# Altium PCB servo_shield.pcbdoc (part 2 of 2)
Units mil, origin at the board's own origin, x right, y up, seen from the top; angles counter-clockwise.
Board outline 4750.63 x 4655.55 mil, 4 copper layers (Top Layer, GND, PWR, Bottom Layer), stack 62.447 mil thick; 94 components, 126 nets, 466 pads, 102 vias.
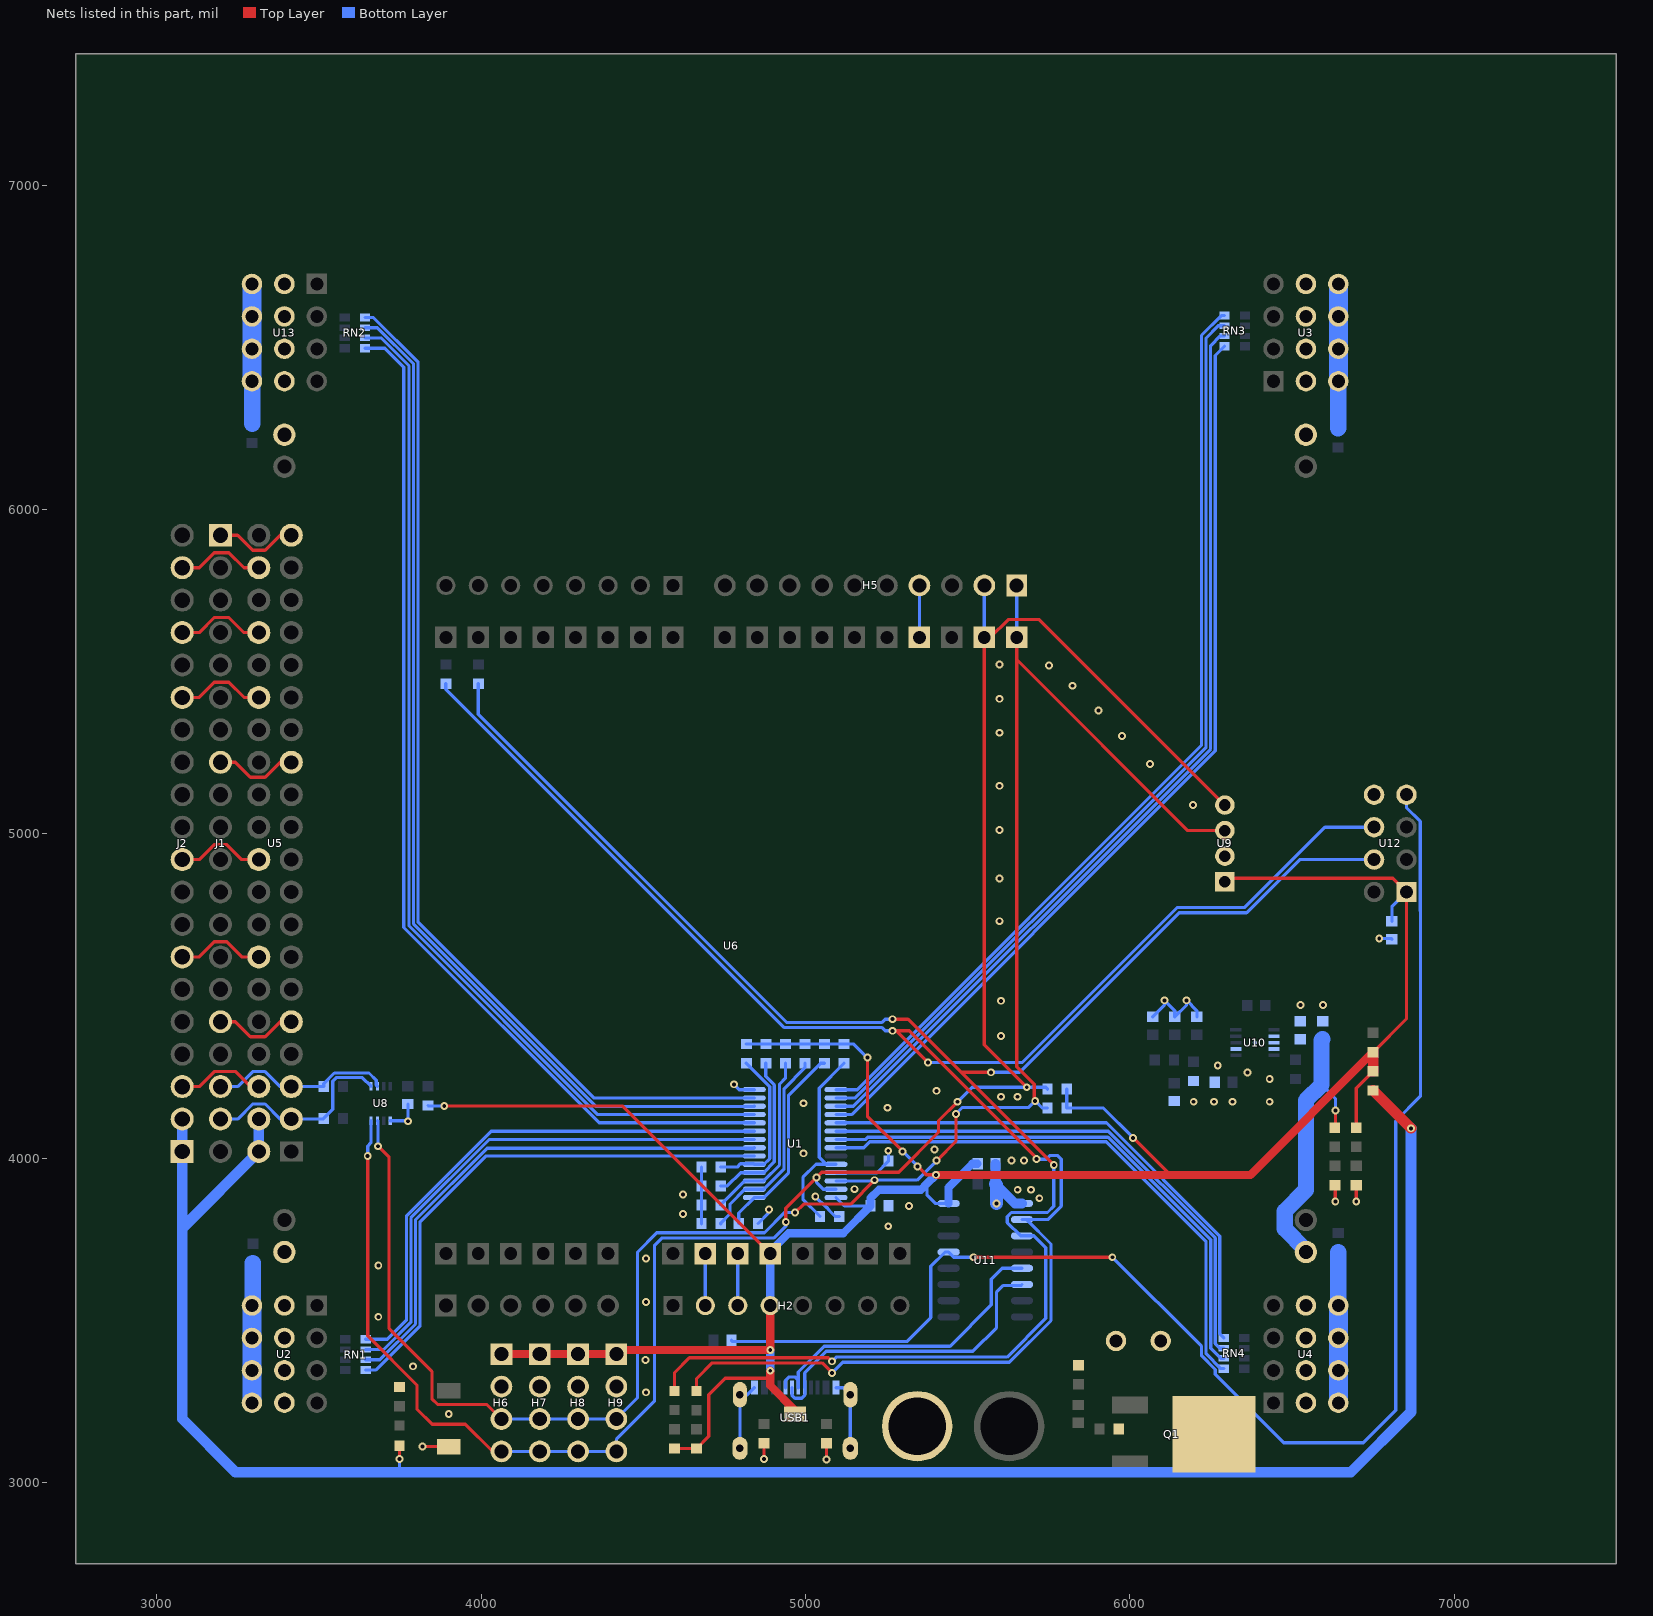
[diagram p4: the nets of this part, all layers, seen from the top]

## Via types
v1: diameter 24.02, hole 12.01, Top Layer to Bottom Layer, 102 vias

## Nets (pads, with @x,y where several pads share a name; then routed paths per layer and width w, separated by ;. In a path a pad name is that pad's centre, name@x,y a point inside that pad or via, vN(x,y) a via of type N, cw(c..) or ccw(c..) an arc to the next point about the centre after c; other vN are vias at no path point) (continued)
+5V: C1.1 C18.1 C22.2 F1.1 H2.4 H6.1 H7.1 H8.1 H9.1 LED3.2 R3.2 R4.2 R24.2 R25.2 R28.2 R29.2 R30.1 SJ_A0.1 SJ_A1.1 SJ_A2.1 SJ_A3.1 SJ_A4.1 SJ_A5.1 U1.28 U6.5V U9.1 U11.16 U12.1 | length 8402.1
  Top Layer w10: v1(3886.5,4160.51) 4436.7,4160.51 U6.5V@4891.65,3705.57 ; R24.2@4596.5,3104.85 R25.2@4664.5,3104.85 4702.5,3142.85 4702.5,3270.51 4753.06,3321.07 4880.72,3321.07 4891.65,3332 ; v1(5191.38,4309.92) 5191.38,4129.21 v1(5299.8,4020.79) ; v1(5345.98,3974.61) 5372.08,3948.51 v1(5402.5,3948.51) ; v1(6010.5,4062.51) 6124.5,3948.51 ; U9.1@6293.5,4852.4 6304.09,4862.99 6811.02,4862.99 U12.1@6853.5,4820.51 6853.5,4429.85 R29.2@6750.5,4326.85 ; LED3.2@6698.5,4094 6698.5,4216.17 R30.1@6750.5,4268.17
  Top Layer w25: H6.1@4062.99,3395.71 H7.1@4181.1,3395.71 H8.1@4299.21,3395.71 H9.1@4417.32,3395.71 4430.13,3408.51 v1(4891.65,3408.51) H2.4@4891.65,3545.51 ; v1(4891.65,3344.51) 4891.65,3332 4891.65,3298.48 4968.5,3221.63 F1.1@4968.5,3211.4 ; v1(5402.5,3948.51) 6124.5,3948.51 6372.16,3948.51 R29.2@6750.5,4326.85
  Top Layer w33: R30.1@6750.5,4268.17 R29.2@6750.5,4326.85
  Bottom Layer w10: R28.2@3836.5,4162.35 3838.34,4160.51 v1(3886.5,4160.51) ; SJ_A4.1@4817.91,4351.63 SJ_A3.1@4878.15,4351.63 SJ_A2.1@4938.39,4351.63 SJ_A1.1@4998.62,4351.63 SJ_A0.1@5058.86,4351.63 SJ_A5.1@5119.09,4351.63 5149.67,4351.63 v1(5191.38,4309.92) ; U1.28@5094.48,3878.55 5120.52,3852.51 C1.1@5200.94,3852.51 ; v1(5299.8,4020.79) v1(5345.98,3974.61) ; 5375.43,3921.44 5375.43,3885.44 5400.4,3860.47 U11.16@5441.71,3860.47 ; R4.2@5806.16,4212.51 R3.2@5806.16,4154.51 5918.5,4154.51 v1(6010.5,4062.51) ; C22.2@6808.5,4730.07 6808.5,4775.51 U12.1@6853.5,4820.51
  Bottom Layer w25: v1(4891.65,3344.51) v1(4891.65,3408.51) ; H2.4@4891.65,3545.51 4891.65,3705.56 4891.65,3711.65 4948.5,3768.51 5116.94,3768.51 C1.1@5200.94,3852.51 5200.94,3876.95 5226.5,3902.51 5356.5,3902.51 5375.43,3921.44 v1(5402.5,3948.51) ; U11.16@5441.71,3860.47 5441.71,3909.72 5514.63,3982.64 C18.1@5531.26,3982.64
A0: R18.2 SJ_A0.2 U1.1 | length 626.9
  Bottom Layer w10: R18.2@4794.84,3798.51 4794.84,3830.86 U1.1@4842.52,3878.54 4871.28,3878.54 4948.35,3955.6 4948.35,4193.62 5047.04,4292.31 SJ_A0.2@5058.86,4292.31
A1: R17.2 SJ_A1.2 U1.2 | length 635.6
  Bottom Layer w10: R17.2@4739.15,3797.91 4739.15,3799.46 4767.72,3828.03 4767.72,3858.08 4813.77,3904.13 U1.2@4842.52,3904.13 4871.27,3904.13 4934.33,3967.19 4934.33,4213.88 4998.62,4278.17 SJ_A1.2@4998.62,4292.31
A2: R16.2 SJ_A2.2 U1.3 | length 553
  Bottom Layer w10: R16.2@4739.15,3856.14 4812.73,3929.73 U1.3@4842.52,3929.73 4871.28,3929.73 4920.31,3978.76 4920.31,4227.6 4938.39,4245.67 SJ_A2.2@4938.39,4292.31
A3: R15.2 SJ_A3.2 U1.4 | length 510.5
  Bottom Layer w10: R15.2@4739.15,3914.37 4759.69,3914.37 4800.63,3955.32 U1.4@4842.52,3955.32 4871.28,3955.32 4904.21,3988.25 4904.21,4225.83 4878.15,4251.89 SJ_A3.2@4878.15,4292.31
A4: R14.2 SJ_A4.2 U1.5 | length 486.8
  Bottom Layer w10: R14.2@4739.15,3972.6 4789.8,3972.6 4799.84,3982.64 4840.79,3982.64 U1.5@4842.52,3980.91 4872.4,3980.91 4890.2,3998.7 4890.2,4220.03 SJ_A4.2@4817.91,4292.31
A5: R13.2 SJ_A5.2 U1.24 | length 613.1
  Bottom Layer w10: R13.2@5045.26,3820 4992.5,3872.76 4992.5,3940.51 5032.9,3980.91 U1.24@5064.6,3980.91 ; U1.24@5094.48,3980.91 U1.24@5064.6,3980.91 ; SJ_A5.2@5119.09,4292.31 5042.8,4216.01 5042.8,4002.72 U1.24@5064.6,3980.91
D+: U11.5 USB1.6 USB1.8 | length 987.3
  Bottom Layer w10: USB1.8@4938.98,3292.36 4938.98,3315.78 4948.2,3325 4969.11,3325 4978.35,3315.77 ; USB1.6@4978.35,3292.36 4978.35,3315.77 ; U11.5@5667.89,3660.47 5606.92,3660.47 5573.47,3627.03 5573.47,3547.48 5446.36,3420.37 5058.07,3420.37 4978.35,3340.64 4978.35,3315.77
D-: U11.6 USB1.5 USB1.7 | length 987
  Bottom Layer w10: USB1.7@4958.66,3292.36 4958.66,3268.96 4967.89,3259.73 4988.8,3259.73 4998.62,3269.54 4998.62,3291.77 USB1.5@4998.03,3292.36 4998.03,3337.7 5064.7,3404.37 5516.36,3404.37 5589.47,3477.48 5589.47,3587.62 5609.02,3607.17 5664.59,3607.17 U11.6@5667.89,3610.47
DTR: C19.1 U11.13 U12.7 | length 4514.9
  Top Layer w10: v1(5518.5,3694.51) v1(5946.5,3694.51)
  Bottom Layer w10: C19.1@4772.06,3438.51 4776.19,3434.39 5312.38,3434.39 5386.5,3508.51 5386.5,3666.51 5430.46,3710.47 U11.13@5441.71,3710.47 5457.67,3694.51 v1(5518.5,3694.51) ; v1(5946.5,3694.51) 6221.54,3419.48 6221.54,3390.43 6263.58,3348.38 6263.58,3333.76 6474.83,3122.51 6720.5,3122.51 6820.5,3222.51 6820.5,4114.51 6896.5,4190.51 6896.5,4762.51 6895.98,4763.03 6895.98,5038.11 6853.5,5080.59 U12.7@6853.5,5120.51
GND: C1.2 C5.2 C6.2 C10.2 C11.2 C12.1 C13.1 C14.1 C15.1 C16.1 C17.1 C18.2 C22.1 H2.2 H2.3 H5.4 H6.2 H7.2 H8.2 H9.2 J1.1 J1.8 J1.16 J2.3 J2.7 J2.10 J2.15 J2.17 J2.19 R1.2 R5.2 R7.2 R8.2 R9.1 R11.1 R12.1 R13.1 R14.1 R15.1 R16.1 R17.1 R18.1 R20.2 R22.1 R23.1 R33.1 R34.1 SW1.1 U1.14 U1.25 U2.9 U2.10 U2.11 U2.12 U3.9 U3.10 U3.11 U3.12 U4.9 U4.10 U4.11 U4.12 U5.6 U5.9 U5.14 U5.20 U5.25 U5.30 U5.34 U5.38 U5.39 U6.GND U6.GND1 U6.GND2 U8.1 U9.2 U10.4 U10.7 U10.11 U11.1 U12.8 U13.9 U13.10 U13.11 U13.12 U14.2 USB1.1 USB1.12 USB1.13 USB1.14 | length 6634.6
  Top Layer w10: J2.3@3078.74,4220.51 3131.21,4220.51 3177.62,4266.93 3244.09,4266.93 3290.5,4220.51 U5.6@3314.96,4220.51 ; J2.7@3078.74,4620.51 3131.21,4620.51 3177.62,4666.93 3216.08,4666.93 3262.49,4620.51 U5.14@3314.96,4620.51 ; J2.10@3078.74,4920.51 3131.21,4920.51 3177.62,4966.93 3216.08,4966.93 3262.49,4920.51 U5.20@3314.96,4920.51 ; J2.15@3078.74,5420.51 3131.21,5420.51 3177.62,5466.93 3222.72,5466.93 3269.14,5420.51 U5.30@3314.96,5420.51 ; J2.17@3078.74,5620.51 3131.21,5620.51 3177.62,5666.93 3222.72,5666.93 3269.14,5620.51 U5.34@3314.96,5620.51 ; J2.19@3078.74,5820.51 3131.21,5820.51 3177.62,5866.93 3222.72,5866.93 3269.14,5820.51 U5.38@3314.96,5820.51 ; J1.16@3196.85,4420.51 3242.67,4420.51 3289.09,4374.09 3334.19,4374.09 3380.6,4420.51 U5.9@3414.96,4420.51 ; J1.8@3196.85,5220.51 3242.67,5220.51 3289.09,5174.09 3334.19,5174.09 3380.6,5220.51 U5.25@3414.96,5220.51 ; J1.1@3196.85,5920.51 3249.32,5920.51 3295.73,5874.09 3334.19,5874.09 3380.6,5920.51 U5.39@3414.96,5920.51 ; v1(3820,3111.22) 3899.78,3111.22 SW1.1@3900.5,3110.49 ; v1(4872.5,3072.41) R22.1@4872.5,3120.85 ; R23.1@5064.5,3120.85 5065.51,3119.85 v1(5065.51,3071.22) ; R7.2@6632.5,3916.85 6634.06,3915.3 v1(6634.06,3865.97) ; v1(6698.5,3865.97) R8.2@6698.5,3916.85
  Bottom Layer w10: U8.1@3720.03,4115.37 3772.91,4115.37 v1(3774.51,4113.76) C6.2@3774.51,4166.54 ; R17.1@4679.83,3797.91 R16.1@4679.83,3856.14 R15.1@4679.83,3914.37 R14.1@4679.83,3972.6 ; H2.2@4691.65,3545.51 U6.GND1@4691.65,3705.56 ; v1(4779.76,4227.6) 4796.14,4211.23 U1.14@4842.52,4211.23 ; H2.3@4791.65,3545.52 U6.GND2@4791.65,3705.57 ; USB1.14@4798.23,3105.35 USB1.14@4798.22,3270.72 4820.87,3270.71 USB1.12@4842.52,3292.36 ; R18.1@4854.16,3798.51 4888.19,3832.54 v1(4888.19,3842.09) ; v1(5030.75,3881.5) 5064.26,3847.99 5065.69,3847.99 5072.12,3841.56 5072.12,3840.13 5092.25,3820 R13.1@5104.58,3820 ; USB1.1@5094.49,3292.36 5117.13,3292.36 USB1.13@5138.78,3270.72 USB1.13@5138.78,3105.35 ; U1.25@5094.48,3955.32 5220.97,3955.32 R1.2@5256.16,3990.51 5256.16,4022.26 v1(5255.63,4022.8) ; U6.GND@5351.65,5605.57 H5.4@5351.65,5765.63 ; C16.1@6070.83,4435.87 6106.97,4472.01 v1(6106.97,4486.61) 6139.09,4454.49 C15.1@6139.09,4435.87 6175.49,4472.26 v1(6175.49,4486.61) 6207.36,4454.74 C14.1@6207.36,4435.87 ; v1(6769.57,4677.36) 6806.09,4677.36 C22.1@6808.5,4674.95
  Bottom Layer w30: C17.1@5586.38,3920.39 C18.2@5586.38,3982.64 ; C17.1@5589.01,3917.76 5646.3,3860.47 U11.1@5667.89,3860.47
  Bottom Layer w39.37: C17.1@5586.38,3920.39 5589.01,3917.76 v1(5589.01,3860.47)
  Bottom Layer w50: U2.9@3293.7,3545.71 3296.5,3548.51 R33.1@3296.5,3676.85 ; U13.12@3293.7,6395.31 3294.5,6394.51 R34.1@3294.5,6264.17 ; R9.1@6642.5,6250.17 6643.31,6250.98 U3.9@6643.31,6395.32 ; R12.1@6643.07,3710.03 6643.07,3545.92 U4.12@6643.29,3545.7
  Bottom Layer w59.06: U4.9@6643.29,3245.7 U4.10@6643.29,3345.7 U4.11@6643.29,3445.7 U4.12@6643.29,3545.7
  Bottom Layer w59.1: U2.12@3293.7,3245.71 U2.11@3293.7,3345.71 U2.10@3293.7,3445.71 U2.9@3293.7,3545.71 ; U13.12@3293.7,6395.31 U13.11@3293.7,6495.31 U13.10@3293.7,6595.31 U13.9@3293.7,6695.31 ; U3.9@6643.31,6395.32 U3.10@6643.31,6495.32 U3.11@6643.31,6595.32 U3.12@6643.31,6695.31
  other v1: 3900.5,3210.84 4508.7,3277.87 3789.88,3358.19 4506.69,3378.02 3683.46,3510.79 4508.7,3556.52 3683.46,3669.41 4508.7,3690.98 5255.63,3789.88 4623.15,3828.03 5319.51,3852.51 5721.46,3876.22 4623.15,3888.27 5654.69,3902.67 5696.14,3902.67 5151.22,3904.33 5635.17,3992.63 5674.34,3992.63 4994.61,4014.76 5398.19,4026.81 5253.62,4155.31 4994.61,4169.37 6197.32,4173.72 6260.31,4173.72 6317.42,4173.72 6431.64,4173.72 5602.99,4189.45 5653.79,4189.45 5404.21,4207.52 6431.64,4243.73 6363.24,4264.35 6271.61,4285.83 5602.99,4376.18 6526.61,4472.56 6595.87,4472.56 5602.99,4485.03 5598.43,4730.62 5598.43,4862.5 5598.43,5011.44 6195.31,5088.98 5598.43,5147.88 6062.8,5215.47 5976.46,5301.81 5598.43,5311.6 5904.17,5380.12 5598.43,5416.2 5823.86,5456.42 5751.57,5518.66 5598.43,5521.93
PWM0: RN1.4 U1.6 | length 1659.2
  Bottom Layer w10: RN1.4@3644.68,3347.09 3676.38,3347.09 3811.97,3482.68 3811.97,3803.94 4014.53,4006.5 U1.6@4842.52,4006.5
PWM1: RN1.3 U1.7 | length 1656.7
  Bottom Layer w10: RN1.3@3644.68,3378.58 3688.05,3378.58 3797.95,3488.48 3797.95,3809.74 4019.04,4030.83 4841.26,4030.83 U1.7@4842.52,4032.09
PWM2: RN1.2 U1.8 | length 1654.3
  Bottom Layer w10: RN1.2@3644.68,3410.08 3699.73,3410.08 3783.94,3494.29 3783.94,3815.55 4026.07,4057.68 U1.8@4842.52,4057.68
PWM3: RN1.1 U1.9 | length 1651.8
  Bottom Layer w10: RN1.1@3644.68,3441.57 3711.4,3441.57 3769.92,3500.09 3769.92,3821.35 4031.83,4083.27 U1.9@4842.52,4083.27
PWM4: RN2.4 U1.10 | length 3201.2
  Bottom Layer w10: RN2.4@3642.68,6497.45 3703.28,6497.45 3762.11,6438.61 3762.11,4711.15 4364.41,4108.86 U1.10@4842.52,4108.86
PWM5: RN2.3 U1.11 | length 3203.1
  Bottom Layer w10: RN2.3@3642.68,6528.94 3691.61,6528.94 3777.91,6442.63 3777.91,4715.95 4359.41,4134.45 U1.11@4842.52,4134.45
PWM6: RN2.2 U1.12 | length 3206.2
  Bottom Layer w10: RN2.2@3642.68,6560.44 3679.93,6560.44 3791.93,6448.44 3791.93,4721.75 4354.35,4159.33 4841.82,4159.33 U1.12@4842.52,4160.04
PWM7: RN2.1 U1.13 | length 3208.1
  Bottom Layer w10: RN2.1@3642.68,6591.93 3668.35,6591.93 3805.94,6454.33 3805.94,4727.56 4347.88,4185.63 U1.13@4842.52,4185.63
PWM8: RN3.4 U1.15 | length 2926.7
  Bottom Layer w10: U1.15@5094.48,4211.23 5159.72,4211.23 6221.46,5272.97 6221.46,6536.72 6282.69,6597.95 RN3.4@6292.32,6597.95
PWM9: RN3.3 U1.16 | length 2923
  Bottom Layer w10: U1.16@5094.48,4185.63 5153.94,4185.63 6235.47,5267.16 6235.47,6528.62 6273.31,6566.46 RN3.3@6292.32,6566.46
PWM10: RN3.2 U1.17 | length 2909.9
  Bottom Layer w10: U1.17@5094.48,4160.04 5148.17,4160.04 6249.49,5261.36 6249.49,6504.71 6279.74,6534.96 RN3.2@6292.32,6534.96
PWM11: RN3.1 U1.18 | length 2893.3
  Bottom Layer w10: U1.18@5094.48,4134.45 5142.4,4134.45 6263.5,5255.55 6263.5,6474.65 RN3.1@6292.32,6503.47
PWM12: RN4.4 U1.19 | length 1647.2
  Bottom Layer w10: U1.19@5094.48,4108.86 5928.54,4108.86 6277.6,3759.8 6277.6,3458.3 RN4.4@6290.31,3445.59
PWM13: RN4.3 U1.20 | length 1663.8
  Bottom Layer w10: U1.20@5094.48,4083.27 5934.31,4083.27 6263.58,3754 6263.58,3428.24 6277.73,3414.1 RN4.3@6290.31,3414.1
PWM14: RN4.2 U1.21 | length 1676.9
  Bottom Layer w10: U1.21@5094.48,4057.68 5186.1,4057.68 5192.71,4064.28 5933.48,4064.28 6249.57,3748.19 6249.57,3413.72 6280.69,3382.6 RN4.2@6290.31,3382.6
PWM15: RN4.1 U1.22 | length 1695.7
  Bottom Layer w10: U1.22@5094.48,4032.09 5180.33,4032.09 5198.51,4050.27 5927.67,4050.27 6235.55,3742.39 6235.55,3396.24 6280.68,3351.11 RN4.1@6290.31,3351.11
RXD: LED4.1 R26.2 U11.3 U12.4 | length 5947.6
  Top Layer w10: LED4.1@4596.5,3282.1 4596.5,3338.51 4642.5,3384.51 5071.41,3384.51 v1(5082.43,3373.5) ; v1(5268.43,4428.43) 5316.58,4428.43 5480.5,4264.51 ; v1(5572.5,4264.51) 5480.5,4264.51 ; v1(5766.03,3978.98) 5480.5,4264.51
  Bottom Layer w10: R26.2@3991.6,5462.85 3991.6,5368.85 4941.94,4418.51 5236.5,4418.51 5246.42,4428.43 v1(5268.43,4428.43) ; v1(5082.43,3373.5) 5095.44,3386.51 5621.88,3386.51 5741.31,3505.95 5741.31,3723.7 5704.54,3760.47 U11.3@5667.89,3760.47 5663.44,3760.47 5622.56,3801.36 5622.56,3819.59 5635.45,3832.48 5746.53,3832.48 5766.03,3851.98 v1(5766.03,3978.98) ; v1(5572.5,4264.51) 5660.5,4264.51 6152.5,4756.51 6360.5,4756.51 6524.5,4920.51 U12.4@6753.5,4920.51
SCL: H5.1 H6.3 H7.3 H8.3 H9.3 R3.1 U1.26 U6.SCL U8.3 U9.3 | length 6171.3
  Top Layer w10: v1(3682.5,4036.51) 3716.5,4002.51 3716.5,3474.51 3848.5,3342.51 3848.5,3258.17 3866.16,3240.51 4018.19,3240.51 H6.3@4062.99,3195.71 ; v1(4968.5,3832.51) 4994.5,3858.51 5139.38,3858.51 v1(5212.94,3932.07) ; v1(5404.5,3992.51) 5464.5,4052.51 v1(5464.5,4136.51) ; U6.SCL@5651.65,5605.57 5651.65,5537.37 ; v1(5708.5,4176.51) 5705.5,4179.52 5705.5,4228.04 5651.65,4281.89 5651.65,5537.37 ; U9.3@6293.5,5009.88 6179.13,5009.88 5651.65,5537.37
  Bottom Layer w10: U8.3@3680.66,4115.37 3682.5,4113.52 v1(3682.5,4036.51) ; H6.3@4062.99,3195.71 H7.3@4181.1,3195.71 H8.3@4299.21,3195.71 H9.3@4417.32,3195.71 4482.5,3260.89 4482.5,3710.51 4541.91,3769.92 4873.99,3769.92 4936.58,3832.51 v1(4968.5,3832.51) ; U1.26@5094.48,3929.73 5210.6,3929.73 v1(5212.94,3932.07) 5213.38,3932.51 5344.5,3932.51 v1(5404.5,3992.51) ; v1(5464.5,4136.51) 5484.5,4156.51 5688.5,4156.51 v1(5708.5,4176.51) 5730.5,4154.51 R3.1@5746.84,4154.51 ; U6.SCL@5651.65,5605.57 H5.1@5651.65,5765.63
SCL2: J1.18 R2.1 U5.5 U8.6 | length 570.4
  Bottom Layer w10: J1.18@3196.85,4220.51 3249.32,4220.51 3295.73,4266.93 3334.19,4266.93 3380.6,4220.51 U5.5@3414.96,4220.51 R2.1@3514.84,4220.51 3514.84,4229.43 3547.93,4262.52 3654.55,4262.52 3677.07,4240 3677.07,4225.25 U8.6@3680.66,4221.67
SDA: H5.2 H6.4 H7.4 H8.4 H9.4 R4.1 U1.27 U6.SDA U8.4 U9.4 | length 6465.9
  Top Layer w10: v1(3650.5,4006.51) 3650.5,3452.51 3802.5,3300.51 3802.5,3226.51 3849.31,3179.71 3951.31,3179.71 4035.31,3095.71 H6.4@4062.99,3095.71 ; v1(4939.73,3802.71) 4939.73,3845.74 v1(5034.5,3940.51) 5050.5,3956.51 5287.73,3956.51 5410.5,4079.28 5410.5,4115.03 v1(5469.25,4173.77) ; v1(5682.5,4218.51) 5551.65,4349.37 U6.SDA@5551.65,5605.57 5570.11,5605.57 5625.06,5660.51 5721.61,5660.51 U9.4@6293.5,5088.62
  Bottom Layer w10: v1(3650.5,4006.51) 3650.5,4037.03 3660.5,4047.03 3660.5,4114.9 U8.4@3660.97,4115.37 ; H6.4@4062.99,3095.71 H7.4@4181.1,3095.71 H8.4@4299.21,3095.71 H9.4@4417.32,3095.71 4417.32,3132.85 4534.5,3250.03 4534.5,3729.96 4558.47,3753.92 4903.49,3753.92 4939.59,3790.03 4939.59,3802.57 v1(4939.73,3802.71) ; v1(5034.5,3940.51) 5034.5,3924.51 5054.88,3904.14 U1.27@5094.48,3904.14 ; v1(5469.25,4173.77) 5513.99,4218.51 v1(5682.5,4218.51) 5740.84,4218.51 R4.1@5746.84,4212.51 ; U6.SDA@5551.65,5605.57 H5.2@5551.65,5765.63
SDA2: J1.19 R6.1 U5.3 U8.5 | length 617.7
  Bottom Layer w10: J1.19@3196.85,4120.51 3249.32,4120.51 3295.73,4166.93 3334.19,4166.93 3380.6,4120.51 U5.3@3414.96,4120.51 3512.84,4120.51 R6.1@3514.84,4122.51 3542.5,4150.17 3542.5,4237.27 3553.74,4248.5 3634.13,4248.5 U8.5@3660.97,4221.67
TXD: LED5.2 R27.2 U11.2 U12.6 | length 6210.2
  Top Layer w10: LED5.2@4664.5,3282.08 4664.5,3320.51 4712.5,3368.51 5051.58,3368.51 v1(5082.43,3337.67) ; v1(5268.43,4392.6) 5280.6,4392.6 ; v1(5378.5,4294.51) 5378.5,4294.69 5280.6,4392.6 ; v1(5712.99,3997.5) 5712.99,3999.87 5320.26,4392.6 5280.6,4392.6
  Bottom Layer w10: R27.2@3891.6,5462.85 3891.6,5446.22 4935.32,4402.51 5236.5,4402.51 5246.42,4392.6 v1(5268.43,4392.6) ; v1(5082.43,3337.67) 5115.27,3370.51 5628.5,3370.51 5757.31,3499.32 5757.31,3735.19 5682.04,3810.47 U11.2@5667.89,3810.47 ; v1(5378.5,4294.51) 5667.88,4294.51 6145.88,4772.51 6353.88,4772.51 6601.88,5020.51 U12.6@6753.5,5020.51 ; U11.2@5667.89,3810.47 5747.19,3810.51 5789.02,3852.34 5789.02,3996.41 5776.92,4008.51 5755.13,4008.51 5743.03,3996.41 5714.08,3996.41 v1(5712.99,3997.5)
VCC: C2.1 C4.1 C5.1 C10.1 C11.1 C23.1 C24.1 LED6.2 Q1.2 R10.1 U2.5 U2.6 U2.7 U2.8 U3.5 U3.6 U3.7 U3.8 U4.5 U4.6 U4.7 U4.8 U10.2 U10.3 U13.5 U13.6 U13.7 U13.8 | length 882.5
  Top Layer w10: LED6.2@6632.5,4094 6634.5,4096 v1(6634.5,4146.51)
  Bottom Layer w10: 6591.69,4226.31 6634.5,4183.5 v1(6634.5,4146.51)
  Bottom Layer w50: C4.1@6543.31,3710.67 6543.31,3716.56 6477.87,3781.99 6477.87,3836.2 6543.31,3901.63 6543.31,4177.93 6591.69,4226.31 6591.69,4363.5 C10.1@6594.88,4366.69
VPI: J2.1 J2.2 LED2.1 R30.2 U5.2 U5.4 | length 6412.9
  Top Layer w10: v1(3748.5,3072.51) LED2.1@3748.5,3113.01
  Top Layer w33: R30.2@6750.5,4208.85 v1(6867.48,4091.88)
  Bottom Layer w10: v1(3748.5,3072.51) 3748.5,3032.02 3748.72,3031.8
  Bottom Layer w33: J2.2@3078.74,4120.51 J2.1@3078.74,4020.51 3078.74,3784.91 ; U5.4@3314.96,4120.51 U5.2@3314.96,4020.51 3079.35,3784.91 3078.74,3784.91 ; v1(6867.48,4091.88) 6867.48,3217.48 6681.8,3031.8 3748.72,3031.8 3243.21,3031.8 3078.74,3196.28 3078.74,3784.91
pads on no net: U11.7 U11.8 U11.9 U11.10 U11.11 U11.12 U11.14 U11.15 U12.2 U12.3 U12.5 USB1.3 USB1.9

## Polygon pours and split planes (outlines as drawn)
GND on GND (solid, remove dead copper): 3006.02,6937.01 6943.03,6937.01 6943.03,3000 3006.02,3000
VCC on PWR (solid, remove dead copper): 3006.02,6937.01 6943.03,6937.01 6943.03,3000 3006.02,3000
GND on Top Layer (solid, remove dead copper, pour order 0): 3006.02,6937.01 6943.03,6937.01 6943.03,3000 3006.02,3000
GND on Bottom Layer (solid, remove dead copper, pour order 2): 3006.02,6937.01 6943.03,6937.01 6943.03,3000 3006.02,3000

## Keep-outs
Board Outline Layer:
  region: 4537.4,5364.21 cw(c4476.38,5364.21) 4415.35,5364.21 cw(c4476.38,5364.21)
  circle w0.1: c4476.38,5364.21 r61.02
  region: 4537.4,5364.21 cw(c4476.38,5364.21) 4415.35,5364.21 cw(c4476.38,5364.21)
  region: 4537.4,4576.81 cw(c4476.38,4576.81) 4415.35,4576.81 cw(c4476.38,4576.81)
  circle w0.1: c4476.38,4576.81 r61.02
  region: 4537.4,4576.81 cw(c4476.38,4576.81) 4415.35,4576.81 cw(c4476.38,4576.81)
  region: 4064.96,3828.78 cw(c4003.94,3828.78) 3942.91,3828.78 cw(c4003.94,3828.78)
  circle w0.1: c4003.94,3828.78 r61.02
  region: 4064.96,3828.78 cw(c4003.94,3828.78) 3942.91,3828.78 cw(c4003.94,3828.78)
  region: 5994.09,3828.78 cw(c5933.07,3828.78) 5872.05,3828.78 cw(c5933.07,3828.78)
  circle w0.1: c5933.07,3828.78 r61.02
  region: 5994.09,3828.78 cw(c5933.07,3828.78) 5872.05,3828.78 cw(c5933.07,3828.78)
  region: 4064.96,6112.24 cw(c4003.94,6112.24) 3942.91,6112.24 cw(c4003.94,6112.24)
  circle w0.1: c4003.94,6112.24 r61.02
  region: 4064.96,6112.24 cw(c4003.94,6112.24) 3942.91,6112.24 cw(c4003.94,6112.24)
  region: 5994.09,6112.24 cw(c5933.07,6112.24) 5872.05,6112.24 cw(c5933.07,6112.24)
  circle w0.1: c5933.07,6112.24 r61.02
  region: 5994.09,6112.24 cw(c5933.07,6112.24) 5872.05,6112.24 cw(c5933.07,6112.24)
  lines w10: 3000,3196.85 3000,6740.16 cw(c3201.61,6738.9) 3202.87,6940.51 6746.18,6940.51 cw(c6741.42,6744.92) 6937.01,6740.16 6937.01,3196.85 cw(c6744.92,3195.59) 6746.18,3003.5 3202.87,3003.5 cw(c3198.11,3201.61) 3000,3196.85

## Other copper
Top Layer:
  region net $1N8744: 5946.34,3129.29 6063.31,3128.68 6063.31,3019.58 5492.43,3019.58 5492.43,3317.9 5494.57,3320.04 5496.06,3318.54 5759.75,3318.54 5793.74,3284.56 5793.74,3211.61 5795.75,3209.61 5914.21,3209.61 5938.31,3185.51 5938.31,3137.32
  region net VCC: 6397.23,3018.98 6081.88,3018.86 6081.88,3333.08 6042.72,3372.24 6042.72,3558.98 6193.31,3558.98 6195.31,3556.97 6195.31,3398.35 6314.18,3279.48 6397.23,3279.48
  region net VCC: 5946.34,3139.33 5946.34,3191.54 5948.35,3193.54 6090.91,3193.54 6090.91,3139.33
  region net $1N33319: 6062.64,3279 6062.8,3278.84 6062.8,3207.6 5942.32,3207.6 5927.27,3222.65 5813.99,3222.65 5813.99,3324.23 5815.83,3326.06 6060.79,3326.06 6062.73,3326 6062.8,3279.15
  region net VCC: 6592.87,3749.72 6596.89,3745.71 6596.89,3030.91 6586.85,3020.87 6386.06,3020.87 6379.47,3027.46 6379.47,3198.85 6499.8,3198.85 6500.51,3199.57 6494.49,3205.59 6494.49,3753.74 6498.5,3749.72
  region net VCC: 6496.5,6742.16 6595.54,6742.16 6595.54,6192.51 6496.5,6192.51
  region net VCC: 3341.65,6742.16 3443.26,6742.16 3443.26,6181.14 3341.65,6181.14
  region net VCC: 3342.14,3750.51 3444.5,3750.51 3444.5,3198.86 3342.14,3198.86
  region net GND: 3247.64,6742.17 3326.06,6742.17 3326.06,6239.49 3247.64,6239.49
  region net GND: 6610.94,6723.39 6687.24,6723.39 6687.24,6233.46 6610.94,6233.46
  region net GND: 3243.74,3715.59 3332.54,3715.59 3332.54,3198.86 3243.74,3198.86
  region net GND: 6610.57,3739.69 6689.35,3739.69 6689.35,3198.85 6610.57,3198.85
  region net GND: 5197.06,3386.51 5476.77,3386.51 5476.77,3031.8 5197.06,3031.8
GND:
  region net GND: 5213.46,3326.06 5496.92,3326.06 5496.92,3025.79 5213.46,3025.79
  region net GND: 5876.06,3538.9 6031.18,3538.9 6031.18,3344.41 5876.06,3344.41
  region net GND: 6600.06,3590.54 6695.37,3590.54 6695.37,3196.84 6600.06,3196.84
  region net GND: 3253.66,3580.73 3350.16,3580.73 3350.16,3191.54 3253.66,3191.54
  region net GND: 3249.76,6745.47 3352.57,6745.47 3352.57,6346.46 3249.76,6346.46
  region net GND: 6602.69,6740.16 6695.39,6740.16 6695.39,6346.46 6602.69,6346.46
PWR:
  region net VCC: 3348.62,6740.16 3449,6740.16 3449,6179.13 3348.62,6179.13
  region net VCC: 6501.65,6740.16 6602.91,6740.16 6602.91,6179.25 6501.65,6179.25
  region net VCC: 6501.03,3757.87 6596.28,3757.87 6596.28,3196.85 6501.03,3196.85
  region net VCC: 6031.18,3545.63 6211.38,3545.63 6211.38,3326.06 6031.18,3326.06
  region net VCC: 3349.1,3757.87 3451.99,3757.87 3451.99,3196.85 3349.1,3196.85
Bottom Layer:
  region net $1N9842: 6380.04,4494.65 6380.04,4452.48 6370.9,4452.48 6345.91,4427.49 6345.91,4388.23 6345.38,4388.75 6307.76,4388.75 6307.76,4414.33 6289.69,4432.4 6289.69,4492.64 6291.69,4494.65
  region net VCC: 6428.5,4380.51 6468.7,4380.51 6474.41,4386.22 6614.96,4386.22 6633.03,4368.15 6633.03,4340.04 6632.52,4339.53 6510.88,4339.53 6500.33,4350.08 6468.39,4350.08 6462.37,4356.1 6428.5,4356.1
  region net $1N9829: 6428.23,4390.24 6428.23,4426.38 6412.17,4442.44 6412.17,4450.47 6404.13,4450.47 6399.98,4454.62 6399.98,4494.65 6476.42,4494.65 6473.85,4492.08 6473.85,4443.89 6460.87,4430.91 6460.87,4390.24
  region net GND: 6498.66,4494.23 6633.45,4494.23 6635.04,4492.64 6635.04,4404.29 6633.03,4402.28 6500.51,4402.28 6498.5,4404.29 6498.66,4404.45
  region net $1N10421: 6273.62,4370.16 6247.52,4344.06 6106.97,4344.06 6096.93,4334.02 6096.93,4277.8 6005.85,4277.8 6005.85,4387.5 6020.63,4402.28 6277.64,4402.28 6299.72,4380.2 6345.26,4380.2 6345.26,4370.16
  region net GND: 6380.04,4442.44 6396.74,4442.44 6402.13,4436.42 6414.66,4423.89 6414.66,4407.25 6421.43,4400.48 6421.43,4342.05 6462.36,4342.05 6463.42,4340.99 6463.42,4330 6422.2,4330 6420.2,4327.99 6420.2,4283.82 6444.9,4283.82 6464.37,4264.35 6464.37,4231.61 6490.47,4205.51 6490.47,4147.28 6285.07,4148.69 6285.34,4188.27 6351.7,4213.46 6351.7,4330 6307.76,4330 6285.67,4307.91 6285,4148.62 6115,4147.28 6112.99,4149.29 6112.99,4195.47 6114.83,4197.31 6178.64,4197.31 6178.64,4267.76 6225.43,4267.76 6301.73,4344.06 6351.93,4344.06 6351.93,4400.28 6357.95,4406.3 6357.95,4426.38 6363.98,4426.38
  region net GND: 5739.53,3848.11 5569.85,3848.11 5569.85,3998.39 5587.62,3980.63 5647.17,3980.63 5651.18,3976.61 5739.53,3976.61
  region net GND: 6215.79,4970.51 6378.03,4970.51 6378.03,4890.2 6215.79,4890.2
  region net GND: 6596.89,3734.91 6689.35,3734.91 6689.35,3198.85 6596.89,3198.85
  region net GND: 4012.99,3344.78 4454.49,3344.78 4454.49,3255.79 4012.99,3255.79
  region net GND: 5211.46,3318.03 5486.54,3318.03 5486.54,3057.01 5211.46,3057.01
  region net GND: 3247.64,6742.17 3334.09,6742.17 3334.09,6237.48 3247.64,6237.48
  region net GND: 6594.88,6749.49 6689.37,6749.49 6689.37,6223.28 6594.88,6223.28
  region net GND: 3243.74,3699.09 3342.14,3699.09 3342.14,3198.86 3243.74,3198.86

## Silkscreen, mask and mechanical layers (free items; w line width, h text height)
Top Silkscreen Layer:
  drawing of 4 lines, arcs and shapes, not listed
  text "PWM PWR GND" at 6381.69,6747.87 h45
  text "GND PWR PWM" at 3231.69,6743.87 h45
  text "PWM7" at 3092.7,6668.01 h45
  text "PWM8" at 6718.7,6666.01 h45
  text "PWM6" at 3092.7,6566.01 h45
  text "PWM9" at 6718.7,6564.01 h45
  text "PWM5" at 3092.7,6466.01 h45
  text "PWM10" at 6718.7,6464.01 h45
  text "PWM4" at 3090.5,6366.51 h45
  text "PWM11" at 6716.5,6364.51 h45
  text "IMU" at 6494.5,5718.51 h45 r270
  text "DTR" at 6893.5,5155.51 h39.37 r270
  text "GND" at 6718.19,5085.51 h39.37 r90
  text "TXD" at 6718.19,4985.43 h39.37 r90
  text "RXD" at 6718.19,4885.43 h39.37 r90
  text "5V" at 6893.5,4840.51 h39.37 r270
  text "EXT / PWR" at 6780.5,4414.51 h45 r270
  text "PI / PWR" at 6780.5,4270.51 h45 r270
  text "PWM3" at 3104.7,3522.01 h45
  text "PWM12" at 6702.7,3522.01 h45
  text "GND" at 4751.65,3446.54 h45
  text "5V" at 4862.09,3446.54 h45
  text "3.3V" at 4946.42,3446.54 h45
  text "Vin" at 4554.88,3444.53 h45
  text "GND" at 4651.26,3444.53 h45
  text "IOREF" at 5135.16,3444.53 h45
  text "5V" at 4476.5,3424.51 h45 r270
  text "PWM2" at 3104.7,3420.01 h45
  text "PWM13" at 6702.7,3420.01 h45
  text "RESET" at 5026.73,3406.38 h45
  text "GND" at 4476,3338.96 h45 r270
  text "GND PWR" at 5268.5,3334.51 h100
  text "PWM1" at 3104.7,3320.01 h45
  text "PWM14" at 6702.7,3320.01 h45
  text "ARDUINO / RESET" at 3806.5,3304.51 h45
  text "RXD" at 4520.54,3297.77 h45 r270
  text "TXD" at 4693.99,3297.4 h45 r270
  text "SCL" at 4478,3236.96 h45 r270
  text "PWM0" at 3102.5,3220.51 h45
  text "PWM15" at 6700.5,3220.51 h45
  text "PWM PWR GND" at 6380.9,3152.01 h45
  text "GND PWR PWM" at 3232.5,3146.51 h45
  text "SDA" at 4478,3136.96 h45 r270
Bottom Silkscreen Layer:
  text "SDA / SCL / GND / 5V" at 6479.53,4813.5 h78.74
  text "A4" at 4843.7,4371.75 h45
  text "A3" at 4905.95,4371.75 h45
  text "A2" at 4966.5,4372.17 h45
  text "A1" at 5024.41,4371.75 h45
  text "A0" at 5084.65,4371.75 h45
  text "A5" at 5144.88,4371.75 h45
  text "I2C Address = 1+A5+A4+A3+A2+A1+A0+RW / Open = 0 / Closed = 1" at 4768.53,4286.5 h45
Mechanical Layer:
  circle w0.1: c4476.38,5364.21 r61.02
  circle w0.1: c4476.38,4576.81 r61.02
  circle w0.1: c4003.94,3828.78 r61.02
  circle w0.1: c5933.07,3828.78 r61.02
  circle w0.1: c4003.94,6112.24 r61.02
  circle w0.1: c5933.07,6112.24 r61.02
Document Layer:
  lines w10: 4003.94,3690.98 5933.07,3690.98 5933.07,7155.55 4003.94,7155.55 4003.94,3690.98

## Text inside footprints (layer, text, board x,y; h text height)
C2: Top Silkscreen Layer "-" at 6578.31,6141.14 h39.37 r270; Top Silkscreen Layer "+" at 6583.31,6261.14 h39.37 r270
C4: Top Silkscreen Layer "-" at 6508.31,3799.88 h39.37 r90; Top Silkscreen Layer "+" at 6503.31,3679.88 h39.37 r90
C23: Top Silkscreen Layer "-" at 3358.7,3799.88 h39.37 r90; Top Silkscreen Layer "+" at 3353.7,3679.88 h39.37 r90
C24: Top Silkscreen Layer "-" at 3428.7,6141.14 h39.37 r270; Top Silkscreen Layer "+" at 3433.7,6261.14 h39.37 r270
U6: Top Silkscreen Layer "RST" at 5141.65,3615.57 h20; Top Silkscreen Layer "Analog In" at 4261.65,3623.57 h20; Top Silkscreen Layer "0" at 4406.65,3755.57 h20; Top Silkscreen Layer "1" at 4306.65,3755.57 h20; Top Silkscreen Layer "2" at 4206.65,3755.57 h20; Top Silkscreen Layer "3" at 4106.65,3755.57 h20; Top Silkscreen Layer "4" at 4006.65,3755.57 h20; Top Silkscreen Layer "5" at 3906.65,3755.57 h20; Top Silkscreen Layer "ARef" at 5516.65,5515.57 h20; Top Silkscreen Layer "Gnd" at 5401.65,5655.57 h20; Top Silkscreen Layer "13" at 5206.65,5555.57 h20; Top Silkscreen Layer "12" at 5106.65,5555.57 h20; Top Silkscreen Layer "11" at 5006.65,5555.57 h20; Top Silkscreen Layer "10" at 4906.65,5555.57 h20; Top Silkscreen Layer "9" at 4826.65,5555.57 h20; Top Silkscreen Layer "8" at 4726.65,5555.57 h20; Top Silkscreen Layer "7" at 4566.65,5555.57 h20; Top Silkscreen Layer "6" at 4466.65,5555.57 h20; Top Silkscreen Layer "5" at 4366.65,5555.57 h20; Top Silkscreen Layer "4" at 4266.65,5555.57 h20; Top Silkscreen Layer "3" at 4166.65,5555.57 h20; Top Silkscreen Layer "2" at 4066.65,5555.57 h20; Top Silkscreen Layer "1" at 3966.65,5555.57 h20; Top Silkscreen Layer "0" at 3866.65,5555.57 h20; Top Silkscreen Layer "Digital I/O" at 5146.65,5655.57 h20; Top Silkscreen Layer "Digital I/O" at 4386.65,5655.57 h20; Top Silkscreen Layer "SCL" at 5696.65,5515.57 h20; Top Silkscreen Layer "SDA" at 5606.65,5655.57 h20